# Altium PCB Sound_Sensor.PcbDoc (part 5 of 6)
Units mm, origin at the board's own origin, x right, y up, seen from the top; angles counter-clockwise.
Board outline 90.25 x 88.01 mm, 2 copper layers (Top Layer, Bottom Layer), stack 1.448 mm thick; 369 components, 272 nets, 1045 pads, 508 vias.
Unrouted connection lines stored in the file: 15.
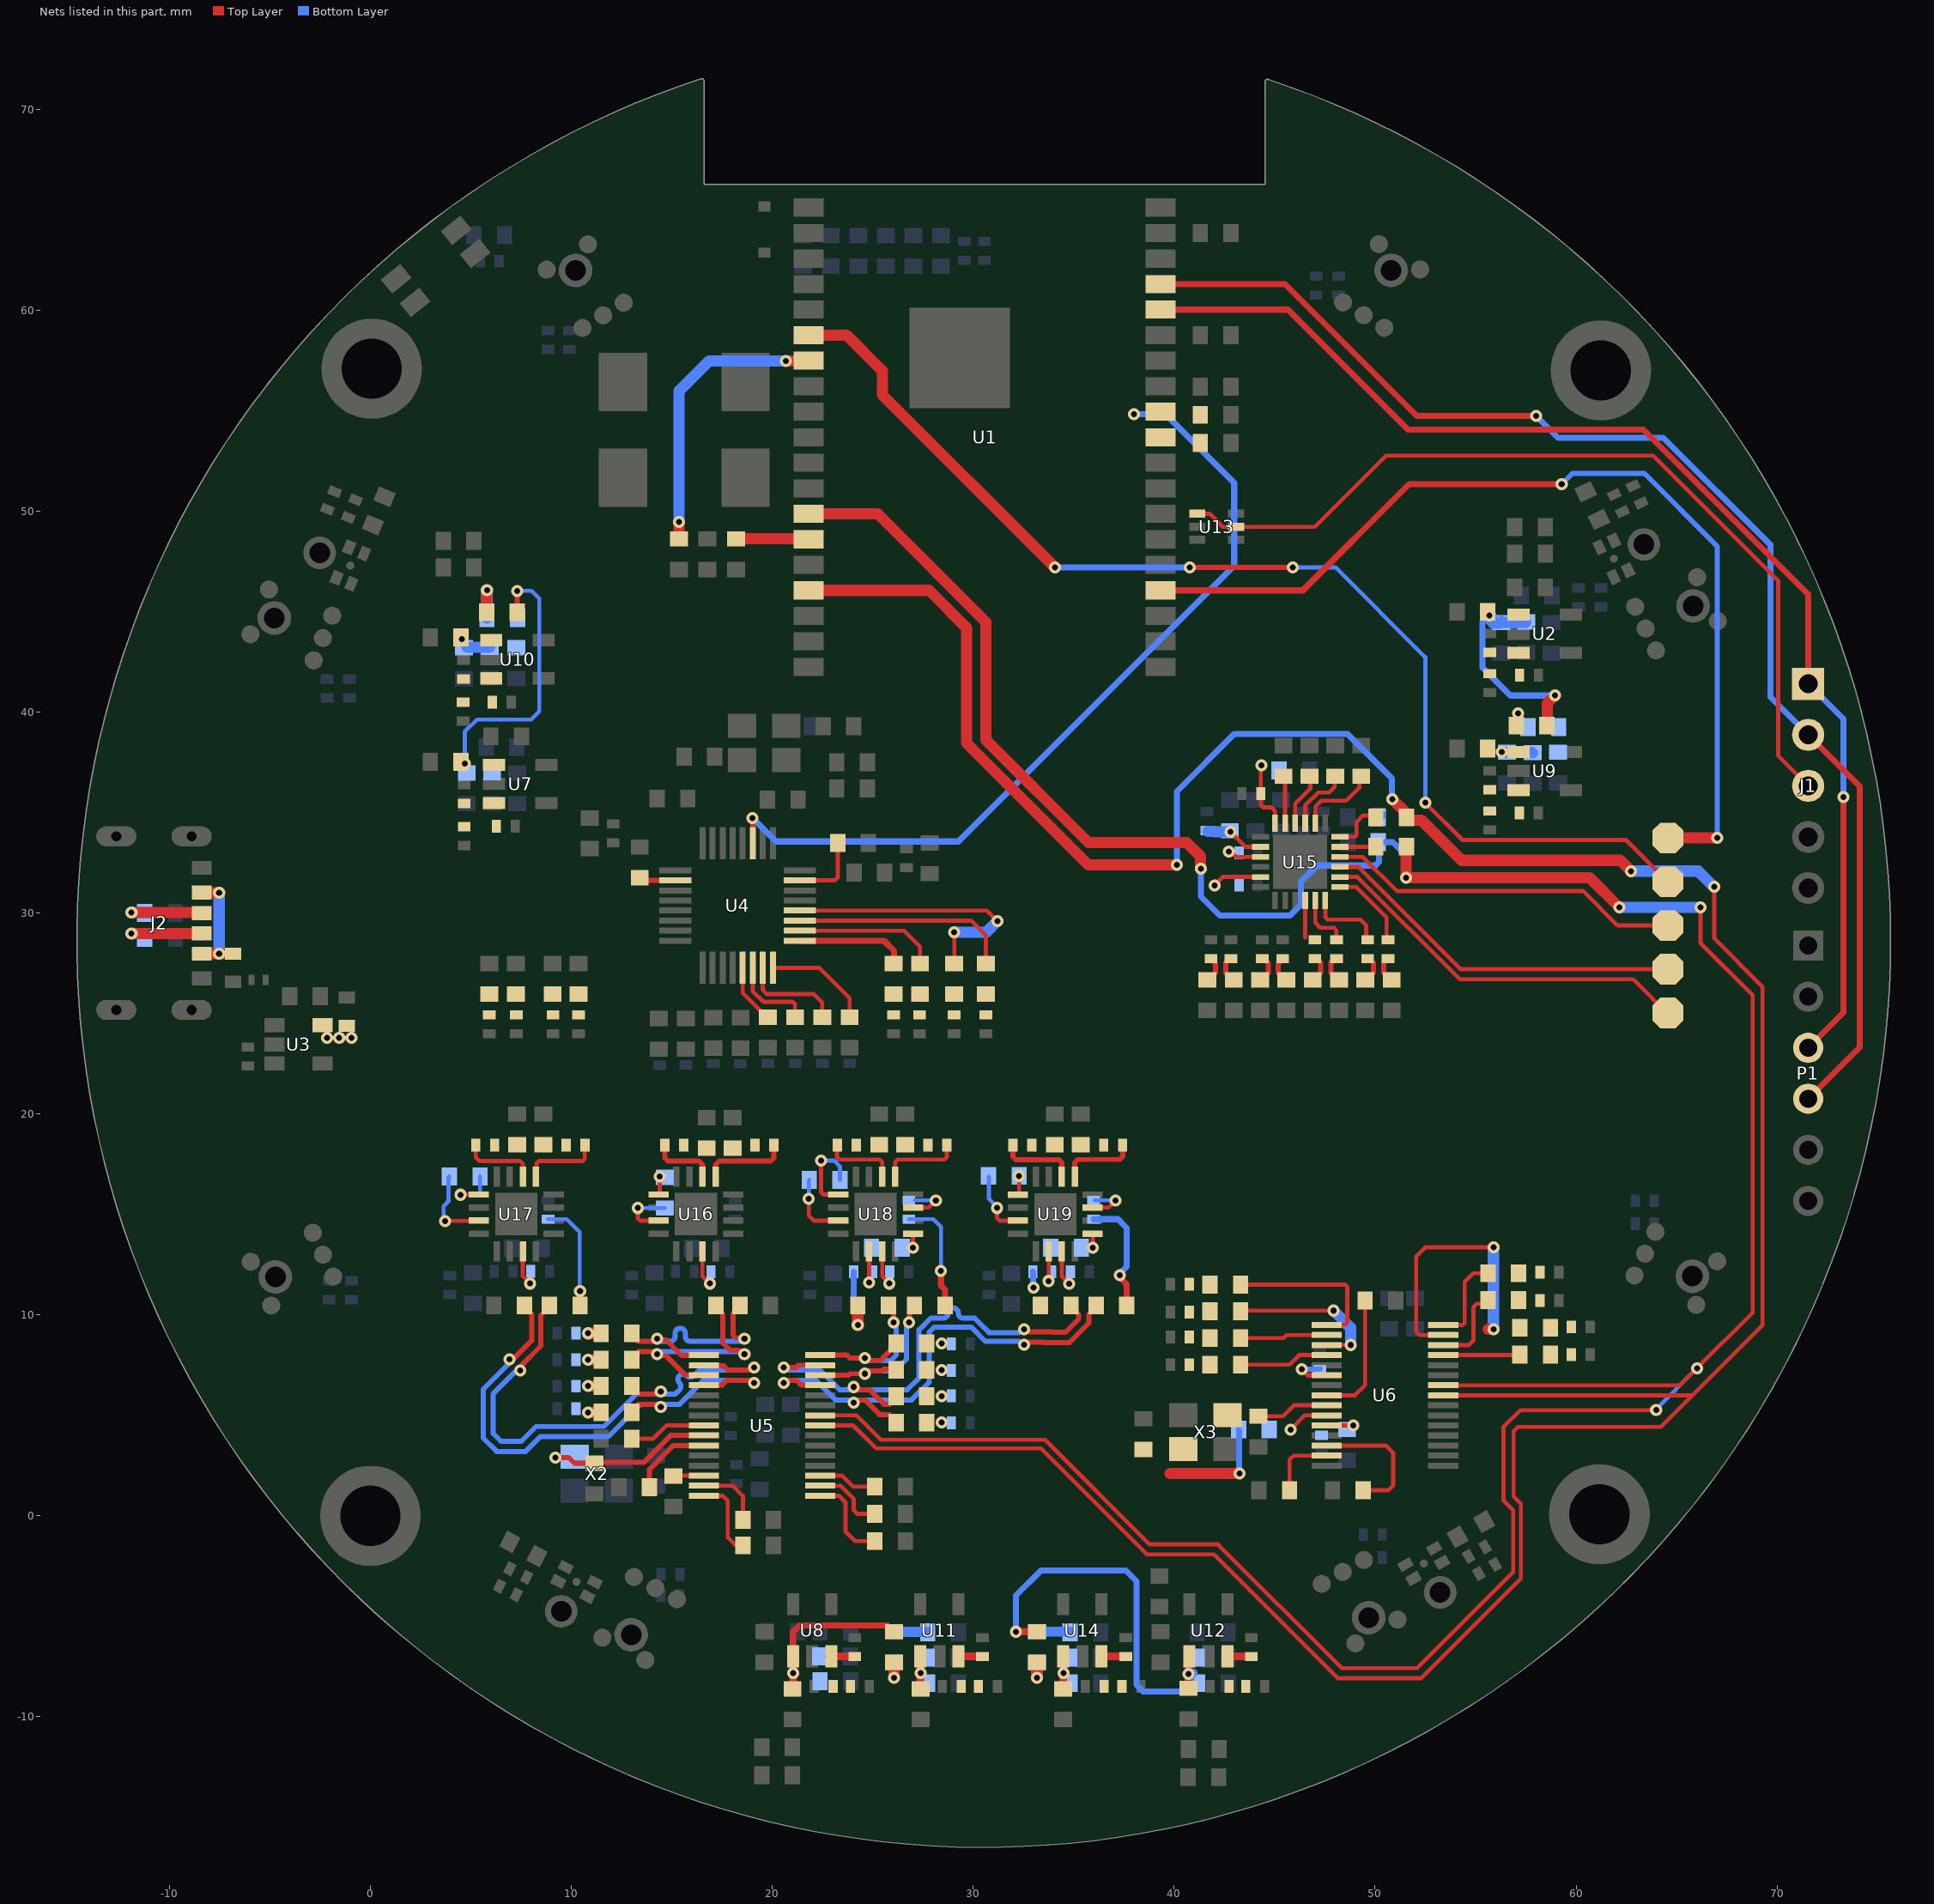
[diagram p4: the nets of this part, all layers, seen from the top]

## Via types
v1: diameter 0.6, hole 0.3, Top Layer to Bottom Layer, 508 vias

## Nets (pads, with @x,y where several pads share a name; then routed paths per layer and width w, separated by ;. In a path a pad name is that pad's centre, name@x,y a point inside that pad or via, vN(x,y) a via of type N, cw(c..) or ccw(c..) an arc to the next point about the centre after c; other vN are vias at no path point) (continued)
NetC67_2: C67.2 SB94.1 | length 5.5
  Top Layer w0.203: v1(10.438,11.187) 10.438,10.466 SB94.1@10.439,10.465
  Bottom Layer w0.203: C67.2@8.839,14.757 9.779,14.757 10.414,14.122 10.414,11.211 v1(10.438,11.187)
NetC68_1: C68.1 U18.5 | length 0.7
  Top Layer w0.203: v1(27.004,13.339) U18.5@27.004,14.038
NetC68_2: C68.2 C92.1 U18.2 | length 1.5
  Top Layer w0.203: v1(24.819,11.611) U18.2@24.819,13.153
NetC69_1: C69.1 U19.5 | length 0.7
  Top Layer w0.203: v1(35.945,13.338) U19.5@35.945,14.036
NetC69_2: C69.2 C93.1 U19.2 | length 1.4
  Top Layer w0.203: v1@33.757,11.709 33.76,11.713 U19.2@33.76,13.151
  other v1: 33.757,11.684
NetC70_2: C70.2 C71.2 U6.11 | length 1.3
  Top Layer w0.203: U6.11@47.587,4.496 v1(48.92,4.496)
NetC72_1: C72.1 U6.6 | length 2.3
  Top Layer w0.254: v1@46.33,7.315 46.332,7.315 46.651,6.996 U6.6@47.587,6.996
  Bottom Layer w0.254: v1(46.355,7.29) C72.1@47.244,7.29 C72.1@47.269,7.315
NetC73_2: C73.2 R9.1 X3.1 | length 5.7
  Top Layer w0.559: 39.802,2.108 v1(43.256,2.108)
  Bottom Layer w0.305: R9.1@43.205,4.293 43.231,4.267 43.231,2.134 v1(43.256,2.108)
NetC90_2: C90.2 R15.1 R19.1 U2.3
NetC91_2: C91.2 R16.1 R20.1 U7.3
NetC92_2: C92.2 SB95.1 | length 3.7
  Top Layer w0.559: v1(24.257,9.5) SB95.1@24.257,10.465
  Bottom Layer w0.305: C92.2@24.054,12.141 24.054,10.541 24.257,10.338 v1(24.257,9.5)
NetC93_2: C93.2 SB96.1 | length 0.9
  Top Layer w0.559: SB96.1@33.249,10.566 SB96.1@33.35,10.465
  Bottom Layer w0.305: C93.2@32.969,12.141 32.982,12.128 32.982,11.367 v1(32.995,11.354)
NetC94_1: C94.1 U18.7 | length 2.3
  Top Layer w0.203: U18.7@27.004,15.338 27.784,15.338 v1(28.143,15.697)
  Bottom Layer w0.203: C94.1@27.102,15.697 v1(28.143,15.697)
NetC94_2: C94.2 SB97.1 | length 5.8
  Top Layer w0.305: v1(28.397,12.188) 28.397,11.455 28.6,11.252 SB97.1@28.6,10.465
  Bottom Layer w0.203: C94.2@26.797,14.757 28.016,14.757 28.397,14.376 v1(28.397,12.188)
NetC95_1: C95.1 U19.7 | length 2.3
  Top Layer w0.203: U19.7@35.945,15.336 36.725,15.336 v1(37.084,15.696)
  Bottom Layer w0.203: C95.1@36.043,15.696 v1(37.084,15.696)
NetC95_2: C95.2 SB98.1 | length 6
  Top Layer w0.305: v1(37.287,11.963) 37.287,11.884 37.643,11.528 SB98.1@37.643,10.465
  Bottom Layer w0.305: C95.2@35.992,14.757 37.211,14.757 37.643,14.326 37.643,12.399 37.287,12.043 v1(37.287,11.963)
NetC98_2: C98.2 U16.3 | length 1.7
  Top Layer w0.203: U16.3@16.529,13.153 16.529,11.919 v1(16.891,11.557)
NetC99_2: C99.2 U17.3 | length 1.7
  Top Layer w0.203: U17.3@7.588,13.153 7.588,11.919 v1(7.95,11.557)
NetC100_2: C100.2 SB18.1
NetC101_2: C101.2 SB19.1
NetC102_2: C102.2 SB20.1
NetC103_2: C103.2 SB21.1
NetC104_2: C104.2 SB22.1
NetC105_2: C105.2 SB23.1
NetC106_2: C106.2 SB24.1
NetC107_2: C107.2 SB25.1
NetC108_2: C108.2 R18.1 R21.1 U8.3 | length 1.2
  Top Layer w0.381: U8.3@22.818,-6.998 C108.2@24.003,-6.998
NetC112_2: C112.2 R28.1 R31.1 U9.3
NetC113_2: C113.2 R29.1 R32.1 U10.3
NetC114_2: C114.2 R30.1 R33.1 U11.3 | length 1.3
  Top Layer w0.381: U11.3@29.337,-7.065 29.27,-6.998 C114.2@30.455,-6.998
NetC116_2: C116.2 R36.1 R37.1 U12.3 | length 1.2
  Top Layer w0.381: U12.3@42.655,-6.998 C116.2@43.84,-6.998
NetC118_2: C118.2 R40.1 R41.1 U14.3 | length 1.2
  Top Layer w0.381: U14.3@36.382,-6.998 C118.2@37.592,-6.998
NetC120_1: C120.1 U15.3 | length 1.6
  Top Layer w0.203: v1@42.774,33.096 42.784,33.096 43.091,32.789 U15.3@44.296,32.789
  other v1: 42.723,33.058
NetC123_1: C123.1 C125.1 U15.2 | length 2.9
  Top Layer w0.203: v1(42.799,34.036) 43.546,33.289 U15.2@44.296,33.289
  Bottom Layer w0.559: C123.1@41.669,34.049 42.013,34.049 42.026,34.036 v1(42.799,34.036)
NetC126_1: C126.1 C127.1 U15.24 | length 3.4
  Top Layer w0.203: v1(44.336,37.338) 44.31,37.313 C126.1@44.31,35.941 44.31,35.374 44.429,35.255 44.831,35.255 45.021,35.065 U15.24@45.021,34.464
NetC128_2: C128.2 U15.5 | length 2.5
  Top Layer w0.203: v1(42.012,31.369) 42.437,31.795 44.29,31.795 U15.5@44.296,31.789
NetC135_2: C135.2 U18.3 | length 1.7
  Top Layer w0.203: U18.3@25.469,13.153 25.469,11.919 v1(25.832,11.557)
NetC136_2: C136.2 U19.3 | length 1.7
  Top Layer w0.203: U19.3@34.41,13.151 34.41,11.918 v1(34.773,11.555)
NetC137_1: C137.1 SB43.2
  other v1: 57.125,39.929
NetC137_2: C137.2 R25.2
NetC138_1: C138.1 SB50.2 | length 2.5
  Top Layer w0.559: SB50.2@5.791,44.958 5.797,44.964 5.797,46.056 v1(5.804,46.063)
  Bottom Layer w0.559: C138.1@5.804,44.677 v1(5.804,46.063)
NetC138_2: C138.2 R26.2
NetC139_1: C139.1 SB51.2 | length 1.5
  Top Layer w0.559: v1(26.06,-8.052) SB51.2@26.06,-7.29
  Bottom Layer w0.559: v1(26.06,-8.052) C139.1@26.06,-7.29
NetC139_2: C139.2 R27.2 | length 1.7
  Bottom Layer w0.508: C139.2@26.06,-5.766 26.073,-5.779 27.724,-5.779 R27.2@27.737,-5.791
NetC140_1: C140.1 SB53.2 | length 1.5
  Top Layer w0.559: v1(33.172,-8.052) SB53.2@33.172,-7.29
  Bottom Layer w0.559: v1(33.172,-8.052) C140.1@33.172,-7.29
NetC140_2: C140.2 R39.2 | length 1.6
  Bottom Layer w0.508: C140.2@33.172,-5.766 R39.2@34.798,-5.766
NetC141_2: C141.2 SB29.1 | length 0.6
  Top Layer w0.559: v1(10.832,9.079) SB29.1@11.481,9.079
NetC142_2: C142.2 SB30.1 | length 0.6
  Top Layer w0.559: v1(10.832,6.457) SB30.1@11.481,6.457
NetC143_2: C143.2 SB32.1 | length 0.6
  Top Layer w0.559: v1(10.832,7.768) SB32.1@11.481,7.768
NetC144_2: C144.2 SB34.1 | length 0.6
  Top Layer w0.559: v1(10.832,5.146) SB34.1@11.481,5.146
NetC145_2: C145.2 SB35.1
  other v1: 28.436,4.638
NetC146_2: C146.2 SB36.1
  other v1: 28.436,7.26
NetC147_2: C147.2 SB37.1
  other v1: 28.436,5.949
NetC148_2: C148.2 SB38.1
  other v1: 28.436,8.571
NetC149_2: C149.2 SB40.1
NetC150_2: C150.2 SB41.1
NetC151_2: C151.2 SB42.1
NetC152_2: C152.2 SB44.1
NetC153_2: C153.2 SB45.1
NetC154_2: C154.2 SB46.1
NetC155_2: C155.2 SB47.1
NetC156_2: C156.2 SB48.1
NetC157_1: C157.1 SB99.2
NetC157_2: C157.2 U16.9 | length 4.3
  Top Layer w0.254: U16.9@17.179,16.873 17.179,17.471 17.36,17.653 19.93,17.653 20.079,17.802 C157.2@20.079,18.44
NetC158_1: C158.1 SB100.2
NetC158_2: C158.2 U17.9 | length 3.9
  Top Layer w0.203: U17.9@8.238,16.873 8.266,16.902 8.266,17.534 8.386,17.653 10.555,17.653 10.674,17.772 10.674,18.434 C158.2@10.681,18.44
NetC159_1: C159.1 SB101.2
NetC159_2: C159.2 U16.10 | length 3.3
  Top Layer w0.254: C159.2@14.656,18.44 14.656,17.802 14.805,17.653 16.347,17.653 16.529,17.471 U16.10@16.529,16.873 U16.10@16.496,16.906
NetC160_1: C160.1 SB102.2
NetC160_2: C160.2 U17.10 | length 3.8
  Top Layer w0.203: C160.2@5.245,18.44 5.245,17.844 5.436,17.653 7.44,17.653 7.588,17.505 U17.10@7.588,16.873 U17.10@7.559,16.902
NetC161_1: C161.1 SB103.2
NetC161_2: C161.2 U18.9 | length 4
  Top Layer w0.203: U18.9@26.119,16.873 26.119,17.609 26.24,17.729 28.57,17.729 28.689,17.848 C161.2@28.689,18.44
NetC162_1: C162.1 SB104.2
NetC162_2: C162.2 U19.9 | length 3.8
  Top Layer w0.254: U19.9@35.06,16.871 35.052,16.88 35.052,17.58 35.201,17.729 37.291,17.729 37.44,17.878 C162.2@37.44,18.44
NetC163_1: C163.1 SB105.2
NetC163_2: C163.2 U18.10 | length 3.6
  Top Layer w0.203: C163.2@23.241,18.39 23.216,18.364 23.216,17.848 23.335,17.729 25.349,17.729 25.469,17.609 U18.10@25.469,16.873
NetC164_1: C164.1 SB106.2
NetC164_2: C164.2 U19.10 | length 3.8
  Top Layer w0.254: C164.2@31.979,18.44 31.979,17.874 32.127,17.725 34.266,17.725 34.414,17.576 U19.10@34.414,16.875
NetC165_2: C165.2 U15.10 | length 1.8
  Top Layer w0.203: 46.521,28.766 U15.10@46.521,30.614
NetC166_2: C166.2 U15.11 | length 2.8
  Top Layer w0.203: U15.11@47.021,30.614 47.021,29.509 47.269,29.261 47.956,29.261 48.075,29.142 C166.2@48.075,28.664
NetC167_2: C167.2 U15.12 | length 3.9
  Top Layer w0.203: U15.12@47.521,30.614 47.521,29.786 47.64,29.667 49.276,29.667 49.552,29.391 C167.2@49.552,28.664 ; C167.2@49.681,28.643 C167.2@49.768,28.556
NetC168_2: C168.2 U15.13 | length 4.1
  Top Layer w0.203: U15.13@48.246,31.289 49.051,31.289 50.571,29.769 C168.2@50.571,28.664
NetFB1_1: FB1.1 J2.A9 J2.B9 | length 5.5
  Top Layer w0.559: J2.A9@-8.391,27.971 v1(-7.524,27.971) FB1.1@-6.833,27.971 ; J2.B9@-8.391,31.011 -8.38,31.001 v1@-7.524,31.001
  Bottom Layer w0.559: v1(-7.524,27.971) v1(-7.524,31.007) v1@-7.524,31.033
NetFB2_1: FB2.1 U3.5
  other v1: -2.15,23.777 -1.545,23.777 -0.94,23.777
NetJ2_A5: J2.A5 R11.1 | length 3.5
  Top Layer w0.559: v1@-11.871,28.981 J2.A5@-8.461,28.981 ; J2.A5@-8.461,28.921 J2.A5@-8.391,28.991
  other v1: -11.882,28.981
NetJ2_B5: J2.B5 R12.1 | length 3.3
  Top Layer w0.559: v1(-11.882,30.017) J2.B5@-8.601,30.017
NetP2_1: P2.1 U15.14 | length 19.4
  Top Layer w0.203: U15.14@48.246,31.789 49.127,31.789 54.221,26.695 62.84,26.695 P2.1@64.77,24.765
NetP3_1: P3.1 U15.16 | length 17.7
  Top Layer w0.203: U15.16@48.246,32.789 49.38,32.789 51.079,31.09 60.35,31.09 62.065,29.375 P3.1@64.567,29.375
NetP4_1: P4.1 U15.15 | length 18.4
  Top Layer w0.203: U15.15@48.246,32.289 48.252,32.283 49.172,32.283 54.258,27.197 P4.1@64.567,27.197
NetP5_1: P5.1 U1.6 | length 58.9
  Top Layer w0.203: v1(52.502,35.484) 54.356,33.63 62.491,33.63 P5.1@64.567,31.554
  Top Layer w0.254: v1(40.781,47.193) v1(45.898,47.193)
  Top Layer w0.559: U1.6@21.819,58.75 23.698,58.75 25.476,56.972 25.476,55.778 v1@34.054,47.201
  Bottom Layer w0.203: v1(45.898,47.193) 48.031,47.193 52.502,42.723 v1(52.502,35.484)
  Bottom Layer w0.305: v1(34.061,47.193) v1(40.781,47.193)
NetP6_1: P6.1 U1.23 | length 48.6
  Top Layer w0.305: U1.23@39.319,46.05 46.406,46.05 51.689,51.333 v1(59.284,51.333)
  Top Layer w0.559: P6.1@64.567,33.732 v1@67.03,33.732
  Bottom Layer w0.254: v1(59.284,51.333) 59.817,51.867 63.398,51.867 67.031,48.235 v1(67.031,33.731)
NetR44_1: R44.1 U16.13 | length 0.9
  Top Layer w0.203: U16.13@14.344,15.988 14.402,16.046 v1(14.402,16.891)
NetR44_2: R44.2 U16.15 | length 2.9
  Top Layer w0.203: v1(13.31,15.316) 13.31,14.807 13.429,14.688 U16.15@14.344,14.688
  Bottom Layer w0.203: v1(13.31,15.316) R44.2@14.656,15.316
NetR45_1: R45.1 U17.13 | length 2.7
  Top Layer w0.203: v1(4.496,15.977) 4.501,15.982 5.397,15.982 U17.13@5.403,15.988
  Bottom Layer w0.203: v1(4.496,15.977) 5.342,15.977 5.461,16.096 R45.1@5.461,16.891
NetR45_2: R45.2 U17.15 | length 4.1
  Top Layer w0.203: v1@3.648,14.672 5.387,14.672 U17.15@5.403,14.688
  Bottom Layer w0.203: v1@3.649,14.672 3.649,14.855 3.648,15.408 3.886,15.646 3.886,16.84 R45.2@3.937,16.891
  other v1: 3.724,14.672
NetR46_1: R46.1 U18.13 | length 4.2
  Top Layer w0.203: v1@22.428,17.704 22.428,16.107 22.547,15.988 U18.13@23.284,15.988
  Bottom Layer w0.203: v1(22.428,17.678) 23.071,17.678 23.368,17.382 R46.1@23.368,16.713
NetR46_2: R46.2 U18.15 | length 3.4
  Top Layer w0.203: v1(21.819,15.773) 21.819,14.935 22.066,14.688 U18.15@23.284,14.688
  Bottom Layer w0.203: v1(21.819,15.773) 21.819,16.688 R46.2@21.844,16.713
NetR47_1: R47.1 U19.13 | length 1
  Top Layer w0.203: U19.13@32.225,15.986 32.283,16.044 v1(32.283,16.916)
  Bottom Layer w0.203: R47.1@32.283,16.889 v1(32.283,16.916)
NetR47_2: R47.2 U19.15 | length 3.3
  Top Layer w0.203: v1(31.191,15.316) 31.191,14.805 31.31,14.686 U19.15@32.225,14.686
  Bottom Layer w0.203: R47.2@30.785,16.864 30.785,15.765 31.191,15.359 v1(31.191,15.316)
NetSB6_1: SB6.1 U1.29
NetSB7_2: SB7.2 U1.14 | length 3.7
  Top Layer w0.559: SB7.2@18.199,48.641 18.224,48.616 21.793,48.616 U1.14@21.819,48.59 ; SB7.2@18.199,48.692 SB7.2@18.25,48.641
NetSB8_2: SB8.2 U4.15 | length 3.7
  Top Layer w0.203: U4.15@21.38,31.617 23.108,31.617 23.259,31.768 SB8.2@23.259,33.479
NetSB9_2: SB9.2 U4.26 | length 1.8
  Top Layer w0.254: SB9.2@13.403,31.65 13.436,31.617 U4.26@15.18,31.617
NetSB14_2: SB14.2 U4.5 | length 3.1
  Top Layer w0.203: U4.5@18.53,27.267 18.53,26.021 19.787,24.765 SB14.2@19.787,24.816
NetSB15_2: SB15.2 U4.6 | length 4.2
  Top Layer w0.203: U4.6@19.03,27.267 19.03,26.106 19.558,25.578 21.014,25.578 21.133,25.459 SB15.2@21.133,24.816
NetSB16_2: SB16.2 U4.7 | length 5
  Top Layer w0.203: U4.7@19.53,27.267 19.53,26.164 19.736,25.959 22.073,25.959 22.479,25.552 SB16.2@22.479,24.816
NetSB17_2: SB17.2 U4.8 | length 5.4
  Top Layer w0.203: U4.8@20.03,27.267 22.339,27.267 23.851,25.756 SB17.2@23.851,24.816
NetSB18_2: SB18.2 U4.9 | length 5.5
  Top Layer w0.305: U4.9@21.38,28.617 25.561,28.617 26.06,28.118 26.06,27.508 SB18.2@26.035,27.483
NetSB19_2: SB19.2 U4.10 | length 7.1
  Top Layer w0.203: U4.10@21.38,29.117 26.56,29.117 27.356,28.321 SB19.2@27.356,27.483
NetSB20_2: SB20.2 U4.11 | length 11
  Top Layer w0.203: U4.11@21.38,29.617 29.895,29.617 30.632,28.88 SB20.2@30.632,27.483
NetSB21_2: SB21.2 U4.12 | length 14
  Top Layer w0.203: U4.12@21.38,30.117 30.685,30.117 31.211,29.591 v1(31.217,29.591) ; SB21.2@29.058,27.483 29.032,27.508 29.058,27.534 v1(29.058,29.032)
  Bottom Layer w0.559: v1@29.063,29.046 29.077,29.032 30.647,29.032 31.205,29.591 v1(31.217,29.591)
NetSB26_2: SB26.2 U5.8 | length 3.9
  Top Layer w0.203: SB26.2@13.005,3.835 14.072,3.835 14.732,4.496 15.469,4.496 15.467,4.497 U5.8@16.595,4.497
NetSB27_2: SB27.2 U5.13 | length 1.5
  Top Layer w0.203: SB27.2@15.088,1.981 15.104,1.997 U5.13@16.595,1.997
NetSB28_2: SB28.2 U5.14 | length 3.4
  Top Layer w0.203: U5.14@16.595,1.497 18.035,1.497 18.542,0.991 SB28.2@18.542,-0.203
NetSB40_2: SB40.2 U6.1 | length 8.2
  Top Layer w0.203: SB40.2@43.307,11.506 48.497,11.506 48.616,11.387 48.616,9.63 48.497,9.511 47.603,9.511 U6.1@47.587,9.496
NetSB41_2: SB41.2 U6.2 | length 4.3
  Top Layer w0.203: SB41.2@43.307,8.848 45.449,8.848 45.597,8.996 U6.2@47.587,8.996
NetSB42_2: SB42.2 U6.3 | length 7.9
  Top Layer w0.203: SB42.2@43.307,10.211 v1(47.93,10.211) ; U6.3@47.587,8.496 47.593,8.502 v1(48.786,8.502)
  Bottom Layer w0.559: v1(47.93,10.211) 48.779,9.362 48.779,8.51 v1(48.786,8.502)
NetSB44_2: SB44.2 U6.4 | length 4.5
  Top Layer w0.203: SB44.2@43.307,7.518 45.745,7.518 46.223,7.996 U6.4@47.587,7.996
NetSB45_2: SB45.2 U6.27 | length 3.8
  Top Layer w0.203: U6.27@53.387,7.996 SB45.2@57.207,7.996
NetSB46_2: SB46.2 U6.28 | length 4.1
  Top Layer w0.203: U6.28@53.387,8.496 54.673,8.496 54.889,8.712 54.889,10.388 55.051,10.55 55.432,10.55 SB46.2@55.618,10.736
NetSB47_2: SB47.2 U6.29 | length 13.5
  Top Layer w0.203: U6.29@53.387,8.996 52.218,8.996 52.04,9.174 52.04,12.899 52.502,13.36 v1(55.888,13.36)
  Top Layer w0.559: v1@55.618,9.279 v1(55.888,9.279)
  Bottom Layer w0.559: v1(55.888,9.279) v1(55.888,13.36)
NetSB48_2: SB48.2 U6.30 | length 4.5
  Top Layer w0.203: U6.30@53.387,9.496 54.352,9.496 54.458,9.601 54.458,11.633 54.889,12.065 SB48.2@55.618,12.065
NetSB49_2: SB49.2 U1.7 | length 14.4
  Top Layer w0.559: SB49.2@15.367,48.616 v1(15.367,49.454) ; v1(20.683,57.463) 21.801,57.463 U1.7@21.819,57.48
  Bottom Layer w0.559: v1(15.367,49.454) 15.367,55.982 16.848,57.463 v1(20.683,57.463)
NetSB70_2: SB70.2 U6.8 | length 6.3
  Top Layer w0.203: U6.8@47.587,5.996 48.998,5.996 49.505,6.502 SB70.2@49.505,10.719
NetSB71_2: SB71.2 U6.13 | length 6.7
  Top Layer w0.203: U6.13@47.587,3.496 50.53,3.496 50.902,3.124 50.902,1.524 50.648,1.27 SB71.2@49.403,1.27
NetSB72_2: SB72.2 U6.14 | length 3.4
  Top Layer w0.203: SB72.2@45.745,1.27 45.745,2.794 45.947,2.996 U6.14@47.587,2.996
NetSB73_1: SB73.1 U5.18 | length 2.9
  Top Layer w0.203: U5.18@22.395,1.997 23.479,1.997 24.02,1.456 SB73.1@25.103,1.456
NetSB74_2: SB74.2 U5.15 | length 3.8
  Top Layer w0.203: U5.15@16.595,0.997 17.533,0.997 17.78,0.75 17.78,-1.067 18.212,-1.499 SB74.2@18.301,-1.499
NetSB75_2: SB75.2 U5.16 | length 4.5
  Top Layer w0.203: U5.16@22.395,0.997 23.31,0.997 23.647,0.66 23.647,-0.787 24.122,-1.262 SB75.2@25.103,-1.262
NetSB76_2: SB76.2 U5.17 | length 4
  Top Layer w0.203: U5.17@22.395,1.497 23.395,1.497 24.054,0.838 24.054,0.279 24.236,0.097 SB76.2@25.103,0.097 SB76.2@24.845,0.355
NetSB77_2: SB77.2 U15.23 | length 2.3
  Top Layer w0.203: U15.23@45.521,34.464 SB77.2@45.521,36.805
NetSB78_1: SB78.1 U15.22 | length 2.7
  Top Layer w0.203: U15.22@46.021,34.464 46.021,35.429 46.774,36.182 SB78.1@46.774,36.805
NetSB79_1: SB79.1 U15.21 | length 3.3
  Top Layer w0.203: U15.21@46.521,34.464 46.521,35.345 47.168,35.992 47.714,35.992 47.989,36.267 47.989,36.775 SB79.1@48.019,36.805
NetSB80_2: SB80.2 U15.20 | length 4
  Top Layer w0.203: U15.20@47.021,34.464 47.021,35.286 47.32,35.585 48.565,35.585 49.217,36.238 49.217,36.714 SB80.2@49.308,36.805
NetSB81_2: SB81.2 U15.18 | length 2.7
  Top Layer w0.203: U15.18@48.246,33.789 48.998,33.789 49.073,33.863 49.073,34.519 49.403,34.849 49.936,34.849 SB81.2@50.038,34.747
NetSB82_2: SB82.2 U15.17 | length 1.8
  Top Layer w0.203: U15.17@48.246,33.289 50.028,33.289 SB82.2@50.038,33.299
OT1_1: C87.2 R4.1 SB43.1 SB62.1 U2.1 | length 10.8
  Top Layer w0.559: SB43.1@58.547,39.319 58.547,39.467 58.565,39.484 58.565,40.429 v1(58.953,40.818)
  Bottom Layer w0.305: v1(55.677,44.806) 55.347,44.475 55.347,42.202 56.731,40.818 v1(58.953,40.818) ; R4.1@55.926,44.755 R4.1@55.926,44.801
  Bottom Layer w0.559: v1(55.677,44.806) 55.677,44.628 55.88,44.425 56.185,44.425 R4.1@56.286,44.526 ; R4.1@56.286,44.45 56.299,44.463 57.493,44.463 C87.2@57.506,44.45
OT1_2: C109.2 R22.1 SB63.1 U9.1 | length 1.4
  Bottom Layer w0.559: R22.1@56.401,37.999 56.414,37.986 57.823,37.986 C109.2@57.836,37.973
  other v1: 56.304,38
OT2_1: C88.2 R5.1 SB50.1 SB64.1 U7.1 | length 13.7
  Top Layer w0.254: SB50.1@7.315,44.958 v1(7.315,46.025)
  Bottom Layer w0.203: v1(4.699,37.426) 4.699,39.014 5.309,39.624 8.009,39.624 8.407,40.022 8.407,45.644 8.026,46.025 v1(7.315,46.025)
OT2_2: C110.2 R23.1 SB65.1 U10.1 | length 1.3
  Top Layer w0.559: SB65.1@4.508,43.712 4.508,43.673 v1(4.559,43.622) SB65.1@4.61,43.571
  Bottom Layer w0.559: v1(4.559,43.622) v1@4.562,43.622 ; R23.1@4.808,43.235 4.826,43.217 C110.2@5.944,43.217
OT3_1: C89.2 R6.1 SB51.1 SB66.1 U8.1 | length 8
  Top Layer w0.203: SB51.1@25.743,-5.448 SB51.1@26.06,-5.766
  Top Layer w0.305: U8.1@21.034,-6.997 21.034,-5.789 21.374,-5.448 SB51.1@25.743,-5.448
  Top Layer w0.381: SB66.1@21.034,-8.521 U8.1@21.034,-6.997
  other v1: 21.044,-7.831
OT3_2: C111.2 R24.1 SB67.1 U11.1 | length 1.6
  Top Layer w0.381: SB67.1@27.305,-8.585 27.369,-8.521 U11.1@27.369,-6.997
  other v1: 27.38,-7.831
OT4_1: C115.2 R34.1 SB53.1 SB68.1 U12.1 | length 20
  Top Layer w0.381: v1(32.131,-5.766) SB53.1@33.172,-5.766 ; SB68.1@40.697,-8.566 40.716,-8.546 v1(40.716,-7.874) 40.736,-7.854 40.736,-7.017 U12.1@40.755,-6.997
  Bottom Layer w0.305: v1(32.131,-5.766) 32.131,-3.962 33.378,-2.715 37.59,-2.715 38.125,-3.251 38.125,-8.41 38.453,-8.738 40.526,-8.738
  Bottom Layer w0.381: 40.526,-8.738 40.811,-8.452 40.811,-7.969 v1@40.97,-7.81
OT4_2: C117.2 R38.1 SB69.1 U14.1 | length 1.4
  Top Layer w0.381: SB69.1@34.481,-8.395 34.481,-7.841 v1(34.492,-7.831) 34.487,-7.826 34.487,-7.003 U14.1@34.481,-6.997
PCM1_N: SB29.2 SB93.2 U5.1 | length 11.5
  Top Layer w0.254: SB29.2@13.005,9.079 13.005,9.016 13.343,8.678 v1@14.046,8.678 ; v1(14.275,8.813) 14.341,8.747 14.717,8.747 15.489,7.974 16.572,7.974 U5.1@16.595,7.997 ; SB93.2@18.39,10.465 18.39,10.401 18.045,10.056 18.045,8.992 18.193,8.843 18.588,8.843 v1(18.618,8.813)
  Bottom Layer w0.254: v1(14.275,8.813) 14.368,8.813 14.503,8.678 14.786,8.678 14.913,8.678 ccw(c14.913,8.932) 15.167,8.932 15.167,9.081 cw(c15.421,9.081) 15.675,9.081 15.675,8.932 ccw(c15.929,8.932) 15.929,8.678 17.247,8.678 18.39,8.678 18.525,8.813 v1(18.618,8.813)
PCM1_P: SB32.2 SB91.2 U5.3 | length 11.8
  Top Layer w0.254: SB32.2@13.005,7.768 13.005,7.832 13.343,8.17 v1@14.046,8.17 ; v1(14.275,8.035) 14.341,7.969 14.713,7.969 15.674,7.008 16.585,7.008 U5.3@16.595,6.997 ; SB91.2@17.192,10.465 17.192,10.401 17.537,10.056 17.537,8.601 17.893,8.245 18.315,8.245 18.525,8.035 v1(18.618,8.035)
  Bottom Layer w0.254: v1(14.275,8.035) 14.368,8.035 14.503,8.17 18.39,8.17 18.525,8.035 v1(18.618,8.035)
PCM2_N: SB30.2 SB94.2 U5.2 | length 26.2
  Top Layer w0.254: v1(7.468,7.239) 7.534,7.305 7.534,7.496 8.484,8.446 8.484,9.97 8.915,10.401 SB94.2@8.915,10.465 ; SB30.2@13.005,6.457 13.005,6.394 13.343,6.056 v1@14.224,6.056 ; U5.2@16.595,7.497 16.618,7.474 17.57,7.474 17.793,7.251 v1@18.872,7.251
  Bottom Layer w0.254: v1@7.211,7.173 6.121,6.084 6.121,4.089 6.502,3.708 7.511,3.708 8.248,4.445 11.626,4.445 13.237,6.056 14.224,6.056 14.359,6.191 v1(14.453,6.191) ; v1@14.681,6.056 15.178,6.056 15.291,6.169 15.38,6.259 ccw(c15.201,6.438) 15.38,6.618 cw(c15.56,6.797) 15.38,6.977 cw(c15.56,6.797) 15.74,6.977 ccw(c15.919,7.157) 16.099,6.977 16.373,7.251 17.231,7.251 18.872,7.251 19.007,7.386 v1(19.101,7.386)
PCM2_P: SB34.2 SB92.2 U5.4 | length 26.5
  Top Layer w0.254: v1(6.918,7.789) 6.984,7.855 7.175,7.855 8.028,8.709 8.028,10.044 7.671,10.401 SB92.2@7.671,10.465 ; SB34.2@13.005,5.146 13.005,5.21 13.343,5.548 v1@14.224,5.548 ; U5.4@16.595,6.497 16.61,6.512 17.511,6.512 17.742,6.743 v1@18.872,6.743
  Bottom Layer w0.254: v1@6.851,7.532 5.613,6.294 5.613,3.879 6.292,3.2 7.722,3.2 8.458,3.937 11.836,3.937 13.447,5.548 14.224,5.548 14.359,5.413 v1(14.453,5.413) ; v1@14.681,5.548 15.388,5.548 16.584,6.743 18.872,6.743 19.007,6.608 v1(19.101,6.608)
PCM3_N: SB36.2 SB97.2 U5.28 | length 8.8
  Top Layer w0.254: U5.28@22.395,6.997 23.805,6.997 23.878,7.071 v1(24.613,7.071) ; v1@24.841,7.206 25.462,7.206 25.549,7.293 26.13,7.293 SB36.2@26.162,7.26 ; v1(26.818,9.627) 26.822,9.631 26.822,10.211 SB97.2@27.076,10.465
  Bottom Layer w0.254: v1(24.613,7.071) 24.706,7.071 24.841,7.206 26.101,7.206 26.683,7.787 26.683,9.398 26.818,9.533 v1(26.818,9.627)
PCM3_P: SB38.2 SB95.2 U5.30 | length 8.4
  Top Layer w0.254: U5.30@22.395,7.997 23.726,7.997 23.875,7.849 v1(24.613,7.849) ; v1@24.841,7.714 25.368,7.714 26.162,8.508 SB38.2@26.162,8.571 ; SB95.2@25.781,10.465 26.035,10.211 26.035,9.631 v1(26.04,9.627)
  Bottom Layer w0.254: v1(24.613,7.849) 24.706,7.849 24.841,7.714 25.891,7.714 26.175,7.997 26.175,9.398 26.04,9.533 v1(26.04,9.627)
PCM4_N: SB35.2 SB98.2 U5.27 | length 24.7
  Top Layer w0.254: v1@20.803,6.743 21.202,6.743 21.448,6.497 U5.27@22.395,6.497 ; v1@24.257,5.766 24.616,5.766 25.342,5.04 25.824,5.04 26.162,4.702 SB35.2@26.162,4.638 ; v1(32.537,8.509) 32.631,8.509 32.766,8.644 33.45,8.644 33.475,8.618 34.791,8.618 35.75,9.578 35.75,10.033 36.119,10.401 SB98.2@36.119,10.465
  Bottom Layer w0.254: v1(20.574,6.608) 20.668,6.608 20.803,6.743 22.162,6.743 23.139,5.766 23.825,5.766 23.96,5.631 24.147,5.631 24.282,5.766 26.931,5.766 27.813,6.648 27.813,9.144 28.067,9.398 29.89,9.398 30.608,8.68 32.273,8.68 32.444,8.509 v1(32.537,8.509)
  other v1: 24.054,5.631
PCM4_P: SB37.2 SB96.2 U5.29 | length 24.5
  Top Layer w0.254: v1(20.574,7.386) 21.195,7.386 21.306,7.497 U5.29@22.395,7.497 ; v1@24.257,6.274 24.826,6.274 25.552,5.548 25.824,5.548 26.162,5.886 SB37.2@26.162,5.949 ; v1(32.537,9.287) 32.631,9.287 32.766,9.152 33.932,9.152 33.958,9.126 34.581,9.126 35.242,9.788 35.242,10.033 34.874,10.401 SB96.2@34.874,10.465
  Bottom Layer w0.254: v1(20.574,7.386) 20.668,7.386 20.803,7.251 20.882,7.251 22.073,7.251 22.372,7.251 23.35,6.274 23.825,6.274 23.96,6.409 24.147,6.409 24.282,6.274 26.721,6.274 27.305,6.858 27.305,9.253 27.886,9.834 28.372,9.834 28.499,9.834 ccw(c28.499,10.088) 28.753,10.088 cw(c29.007,10.088) 29.261,10.088 ccw(c29.515,10.088) 29.515,9.834 30.071,9.834 30.226,9.679 30.789,9.116 32.273,9.116 32.444,9.287 v1(32.537,9.287)
  other v1: 24.054,6.409
RTS: J1.3 U13.1 U13.5 | length 44.1
  Top Layer w0.203: U13.1@41.148,49.865 41.768,49.865 42.418,49.215 U13.5@43.088,49.215 46.05,49.215 47.005,49.215 50.546,52.756 63.83,52.756 70.053,46.533 70.053,37.821 J1.3@71.552,36.322
RX: J1.1 P1.3 U1.34 | length 62.1
  Top Layer w0.305: U1.34@39.319,60.02 45.669,60.02 51.638,54.051 63.348,54.051 71.552,45.847 J1.1@71.552,41.402 ; P1.3@71.552,23.292 73.304,25.044 v1(73.304,35.763)
  Bottom Layer w0.305: J1.1@71.552,41.402 73.304,39.649 v1(73.304,35.763)
SCL: R42.1 SB82.1 U1.13 U5.24 U6.24 | length 161.7
  Top Layer w0.203: U5.24@22.395,4.997 24.187,4.997 25.4,3.785 33.579,3.785 38.786,-1.422 42.185,-1.422 48.34,-7.577 52.087,-7.577 56.871,-2.794 56.871,0.279 56.388,0.762 56.388,4.416 57.23,5.258 v1(63.983,5.258) ; U6.24@53.387,6.496 65.17,6.496 v1(66.015,7.341) 68.783,10.109 68.783,25.908 66.192,28.499 v1(66.192,30.277) v1@66.192,30.328
  Top Layer w0.559: U1.13@21.819,49.86 25.248,49.86 30.629,44.479 30.629,38.612 35.738,33.503 40.616,33.503 41.318,32.801 41.318,32.215 v1(41.326,32.207) ; SB82.1@51.544,33.299 v1(51.544,31.758) 60.673,31.758 v1(62.154,30.277)
  Bottom Layer w0.203: v1(63.983,5.258) 63.983,5.309 v1(66.015,7.341)
  Bottom Layer w0.305: v1(41.326,32.207) 41.326,30.81 42.266,29.87 45.765,29.87 46.304,30.409 46.304,31.555 47.109,32.36 50.012,32.36 50.19,32.538 50.19,33.485 R42.1@50.156,33.519 50.885,33.519 51.544,32.86 v1(51.544,31.758)
  Bottom Layer w0.559: v1@62.173,30.277 v1(66.192,30.277)
SCLK: SB4.1 U1.30 U4.19 | length 41.9
  Top Layer w0.254: U4.19@19.03,33.467 v1@19.03,34.706
  Bottom Layer w0.305: v1(19.02,34.717) 20.183,33.553 29.262,33.553 42.99,47.281 42.99,51.397 39.573,54.813 v1(37.998,54.813)
SDA: R43.1 SB81.1 U1.16 U5.23 U6.23 | length 162.3
  Top Layer w0.203: U5.23@22.395,4.497 24.027,4.497 25.171,3.353 33.376,3.353 38.651,-1.922 41.978,-1.922 48.133,-8.077 52.295,-8.077 57.252,-3.12 57.252,0.606 56.888,0.969 56.888,4.208 57.099,4.42 64.211,4.42 65.788,5.996 ; U6.23@53.387,5.996 65.788,5.996 ; v1(66.878,31.293) 66.878,28.727 69.283,26.322 69.283,9.492 65.788,5.996
  Top Layer w0.559: U1.16@21.819,46.05 27.813,46.05 29.667,44.196 29.667,38.456 35.738,32.385 v1(40.132,32.385) ; v1@50.859,35.654 51.46,35.052 51.46,34.849 SB81.1@51.562,34.747 ; SB81.1@51.562,34.707 51.664,34.605 52.313,34.605 54.305,32.614 62.205,32.614 v1(62.738,32.08)
  Bottom Layer w0.305: v1(40.132,32.385) 40.132,36.043 43.002,38.913 48.616,38.913 50.843,36.685 v1@50.843,35.669
  Bottom Layer w0.559: R43.1@50.156,34.764 R43.1@50.258,34.865 ; v1@50.843,35.669 v1(50.851,35.662) ; v1@62.746,32.061 62.746,32.069 62.757,32.08 66.08,32.08 66.867,31.293 v1(66.878,31.293)
TLV_ADC.TLV_IN1_N: C25.1 SB84.2 | length 1.4
  Top Layer w0.254: C25.1@42.828,27.724 42.739,27.724 42.565,27.55 42.565,27.007 42.902,26.67 SB84.2@42.966,26.67
TLV_ADC.TLV_IN1_P: C24.1 SB83.2 | length 1.4
  Top Layer w0.254: SB83.2@41.656,26.67 41.719,26.67 42.057,27.007 42.057,27.474 42.024,27.506 42.024,27.622 41.923,27.724 C24.1@41.834,27.724
TLV_ADC.TLV_IN2_N: C32.1 SB86.2 | length 1.4
  Top Layer w0.254: C32.1@45.401,27.724 45.312,27.724 45.21,27.622 45.21,27.499 45.185,27.474 45.185,27.007 45.522,26.67 SB86.2@45.586,26.67
TLV_ADC.TLV_IN2_P: C30.1 SB85.2 | length 1.4
  Top Layer w0.254: SB85.2@44.276,26.67 44.339,26.67 44.677,27.007 44.677,27.517 44.47,27.724 C30.1@44.381,27.724
TLV_ADC.TLV_IN3_N: C166.1 SB88.2 | length 1.4
  Top Layer w0.254: C166.1@48.075,27.724 47.986,27.724 47.805,27.543 47.805,27.007 48.142,26.67 SB88.2@48.206,26.67
TLV_ADC.TLV_IN3_P: C165.1 SB87.2 | length 1.4
  Top Layer w0.254: SB87.2@46.896,26.67 46.959,26.67 47.297,27.007 47.297,27.521 47.093,27.724 C165.1@47.005,27.724
TLV_ADC.TLV_IN4_N: C168.1 SB90.2 | length 1.4
  Top Layer w0.254: C168.1@50.648,27.724 50.559,27.724 50.457,27.622 50.457,27.506 50.424,27.474 50.424,27.007 50.762,26.67 SB90.2@50.825,26.67
TLV_ADC.TLV_IN4_P: C167.1 SB89.2 | length 1.4
  Top Layer w0.254: SB89.2@49.515,26.67 49.579,26.67 49.916,27.007 49.916,27.525 49.717,27.724 C167.1@49.628,27.724
TX: J1.2 P1.4 U1.35 | length 66.2
  Top Layer w0.305: U1.35@39.319,61.29 45.517,61.29 52.073,54.734 58.01,54.734 v1(58.014,54.737) ; P1.4@71.552,20.752 74.117,23.317 74.117,36.297 J1.2@71.552,38.862
  Bottom Layer w0.305: v1(58.014,54.737) 59.106,53.645 64.338,53.645 69.672,48.311 69.672,40.742 J1.2@71.552,38.862
XI_A: R8.2 U5.10 | length 4.4
  Top Layer w0.254: R8.2@13.894,1.143 13.894,2.311 15.08,3.497 U5.10@16.595,3.497
XI_B: R9.2 U6.10 | length 2.1
  Top Layer w0.203: v1(45.796,4.293) 46.5,4.996 U6.10@47.587,4.996
XO_A#: C62.2 U5.9 X2.3 | length 8.1
  Top Layer w0.254: v1(9.203,2.905) 9.871,2.905 10.16,2.616 C62.2@11.151,2.616 ; C62.2@11.151,2.667 13.614,2.667 14.945,3.997 U5.9@16.595,3.997
XO_B#: C74.2 U6.9 X3.3 | length 3.6
  Top Layer w0.203: C74.2@44.188,4.955 45.417,4.955 45.958,5.496 U6.9@47.587,5.496
pads on no net: U1.4 U1.5 U1.17 U1.18 U1.19 U1.20 U1.21 U1.22 U1.24 U1.27 U1.28 U1.32 U3.4 U4.27 U5.5 U5.22 U5.26 U6.5 U6.22 U6.26 U16.6 U16.8 U16.12 U16.14 U17.6 U17.8 U17.12 U17.14 U18.6 U18.8 U18.12 U18.14 U19.6 U19.8 U19.12 U19.14

## Polygon pours and split planes (outlines as drawn)
GND on Top Layer "GND_L01_P006" (hatched 45Degree grid 0.508 track 0.203, remove dead copper, pour order 6): 9.304,65.659 3.556,61.392 0.499,58.651 -2.007,55.931 -4.242,52.984 -5.055,51.765 -6.712,49.055 -8.35,45.732 -10.008,41.275 -10.82,38.354 -11.558,34.291 -11.878,30.896 -11.937,28.038 -11.811,25.375 -11.201,20.701 -10.414,17.323 -9.347,14.173 -7.264,9.5 -5.385,5.994 -2.134,1.473 2.616,-3.378 6.842,-6.512 10.189,-8.656 13.36,-10.16 16.307,-11.328 20.371,-12.598 24.486,-13.386 27.457,-13.665 30.531,-13.818 33.68,-13.716 37.313,-13.259 40.411,-12.687 44.044,-11.633 47.828,-10.16 51.359,-8.382 54.559,-6.401 58.877,-3.023 62.23,0.356 64.773,3.514 66.015,5.334 67.996,8.687 69.799,12.471 71.501,17.577 72.394,21.571 72.741,24.004 72.974,28.575 72.882,31.633 72.339,35.687 71.806,38.684 70.815,42.139 69.926,44.272 69.132,46.285 67.361,49.632 66.015,51.918 64.338,54.28 61.214,57.988 56.871,61.849 52.213,65.404
GND on Bottom Layer "GND_L02_P007" (hatched 45Degree grid 0.508 track 0.203, remove dead copper, pour order 7): 9.304,65.659 3.556,61.392 0.499,58.651 -2.007,55.931 -4.242,52.984 -5.055,51.765 -6.712,49.055 -8.35,45.732 -10.008,41.275 -10.82,38.354 -11.558,34.291 -11.878,30.896 -11.937,28.038 -11.811,25.375 -11.201,20.701 -10.414,17.323 -9.347,14.173 -7.264,9.5 -5.385,5.994 -2.134,1.473 2.616,-3.378 6.842,-6.512 10.189,-8.656 13.36,-10.16 16.307,-11.328 20.371,-12.598 24.486,-13.386 27.457,-13.665 30.531,-13.818 33.68,-13.716 37.313,-13.259 40.411,-12.687 44.044,-11.633 47.828,-10.16 51.359,-8.382 54.559,-6.401 58.877,-3.023 62.23,0.356 64.773,3.514 66.015,5.334 67.996,8.687 69.799,12.471 71.501,17.577 72.394,21.571 72.741,24.004 72.974,28.575 72.882,31.633 72.339,35.687 71.806,38.684 70.815,42.139 69.926,44.272 69.132,46.285 67.361,49.632 66.015,51.918 64.338,54.28 61.214,57.988 56.871,61.849 52.213,65.404

## Other copper
Top Layer:
  rectangle net GND: 14.351,31.953 16.002,34.849
  rectangle net NetFB2_1: -2.991,23.393 -0.584,25.009
  rectangle net NetFB1_1: -8.915,27.559 -6.325,28.372
  region net 5V: -5.588,24.028 -5.588,26.436 -6.629,26.436 -6.629,24.028
  rectangle net 5V: -7.341,26.187 -5.588,27.229
  rectangle net 5V: -6.604,21.463 -3.251,22.86
  region net 5V: -3.251,22.047 -3.251,24.79 -4.013,24.79 -4.013,22.047
  rectangle net GND: 14.427,36.754 16.256,38.684
  rectangle net NetC64_2: 14.757,9.982 16.129,11.049
  region net GND: 7.923,-1.216 7.434,-0.962 5.992,-3.733 6.48,-3.987
  rectangle net NetC91_2: 4.28,33.822 6.719,35.816
  rectangle net 3V3: -2.991,25.324 -0.584,27.356
  rectangle net NetC61_2: 11.938,0.965 13.183,1.956
  rectangle net NetC1_1: 55.474,45.745 57.556,47.142
  rectangle net NetC100_2: 25.527,24.638 26.492,26.416
  rectangle net NetC101_2: 26.848,24.638 27.813,26.416
  rectangle net NetC103_2: 28.55,24.638 29.515,26.416
  rectangle net NetC102_2: 30.124,24.638 31.09,26.416
  rectangle net NetC104_2: 5.359,24.663 6.477,26.365
  rectangle net NetC105_2: 6.68,24.663 7.798,26.365
  rectangle net NetC106_2: 8.509,24.663 9.627,26.365
  rectangle net NetC107_2: 10.058,24.689 10.668,26.34
  rectangle net NetC162_1: 34.874,18.085 36.754,18.872
  region net NetC164_1: 34.544,18.872 32.664,18.872 32.664,18.085 34.544,18.085
  region net NetC163_1: 25.806,18.872 23.927,18.872 23.927,18.085 25.806,18.085
  rectangle net NetC161_1: 26.137,18.085 28.016,18.872
  region net NetC159_1: 17.196,18.872 15.316,18.872 15.316,17.958 17.196,17.958
  rectangle net NetC157_1: 17.577,17.958 19.38,18.872
  rectangle net NetC45_2: 13.81,22.809 14.877,23.724
  rectangle net NetC46_2: 15.167,22.809 16.234,23.724
  rectangle net NetC47_2: 16.525,22.86 17.591,23.774
  rectangle net NetC48_2: 17.882,22.86 18.948,23.774
  region net NetC160_1: 7.798,18.999 5.893,18.999 5.893,18.059 7.798,18.059
  rectangle net NetC158_1: 8.128,18.059 10.033,18.999
  rectangle net NetC66_2: 19.507,9.271 20.574,10.973
  rectangle net NetC145_2: 27.305,4.068 28.778,5.197
  rectangle net NetC147_2: 27.305,5.379 28.778,6.508
  rectangle net NetC146_2: 27.305,6.69 28.778,7.819
  rectangle net NetC148_2: 27.305,8.001 28.778,9.13
  rectangle net NetC152_2: 40.462,7.036 42.164,7.976
  rectangle net NetC150_2: 40.462,8.365 42.164,9.305
  rectangle net NetC151_2: 40.462,9.694 42.164,10.634
  rectangle net NetC149_2: 40.462,11.024 42.164,11.963
  rectangle net NetC26_1: 19.126,-6.248 20.523,-5.359
  rectangle net NetC28_1: 38.811,-6.274 39.802,-4.089
  rectangle net NetC93_2: 32.842,9.982 33.909,11.201
  rectangle net NetC93_2: 32.563,9.982 33.274,11.684
  rectangle net NetC153_2: 58.332,7.544 60.186,8.56
  rectangle net NetC155_2: 58.332,8.873 60.186,9.889
  rectangle net NetC154_2: 56.744,10.253 58.598,11.269
  rectangle net NetC156_2: 56.744,11.582 58.598,12.598
  rectangle net NetC23_1: 5.283,38.252 6.528,39.497
  rectangle net NetC165_2: 46.419,28.346 47.334,28.956
  rectangle net GND: 18.898,64.643 21.768,65.557
  rectangle net GND: -13.208,23.063 -7.823,27.127
  rectangle net GND: -13.138,31.648 -7.01,34.366
  rectangle net 3V3: 17.501,50.165 19.964,64.287
  rectangle net 3V3: 18.923,63.322 21.234,64.287
  rectangle net GND: -5.359,25.146 -3.505,27.229
  rectangle net GND: 43.129,35.255 43.84,36.297
  rectangle net 3V3: 24.282,32.868 25.222,38.075
  region net GND: 61.577,50.434 61.01,51.624 59.797,51.045 60.364,49.855
  region net GND: 55.039,-1.132 56.338,-0.397 55.326,1.392 54.027,0.657
  region net GND: 55.956,-2.87 56.448,-2.592 54.468,0.907 53.977,0.629
  region net 3V3: 54.807,-3.608 55.722,-3.09 54.186,-0.375 53.271,-0.893
  region net GND: 7.641,-1.062 6.826,-0.638 6.334,-1.583 7.149,-2.007
  rectangle net 3V3: 47.371,34.239 48.717,34.976
  rectangle net 3V3: 50.076,36.601 57.709,37.414
  rectangle net 3V3: 43.79,33.655 44.679,34.442
  rectangle net 3V3: 24.384,32.868 28.626,34.112
  region net GND: 8.068,-5.067 10.043,-6.096 10.882,-4.484 8.907,-3.456
  region net GND: 63.136,51.128 62.881,51.662 61.226,50.873 61.481,50.339
  region net 3V3: 61.628,47.978 61.118,49.049 60.547,48.777 61.058,47.706
  region net 3V3: 63.281,50.999 60.19,49.525 60.6,48.665 63.692,50.139
  region net 3V3: 9.661,-0.305 8.91,0.086 6.604,-4.343 7.355,-4.734
  rectangle net 3V3: 0.813,36.044 6.719,36.806
  rectangle net OT2_1: 4.089,37.009 6.719,38.025
  region net GND: 41.224,5.637 37.94,5.637 37.94,4.42 41.224,4.42
  region net NetC73_2: 41.224,3.937 37.94,3.937 37.94,1.829 41.224,1.829
  rectangle net GND: 41.885,2.591 44.907,3.937
  rectangle net XO_B#: 41.885,4.42 44.907,5.639
  rectangle net NetSB74_2: 17.678,-2.032 18.999,-0.965
  rectangle net \C\S: 19.888,32.639 20.933,34.29
  rectangle net NetSB47_2: 55.22,8.848 57.709,9.855
  rectangle net 3V3: 41.406,-9.881 42.092,-6.419
  rectangle net OT3_1: 25.476,-6.299 26.619,-5.182
  rectangle net NetC116_2: 42.339,-8.883 43.025,-6.419
  rectangle net NetC108_2: 23.025,-8.89 24.384,-8.077
  rectangle net NetC114_2: 29.4,-8.89 30.759,-8.077
  rectangle net NetC116_2: 42.779,-8.883 43.929,-8.07
  rectangle net NetC118_2: 36.512,-8.89 37.871,-8.077
  rectangle net 3V3: 35.114,-9.728 35.8,-6.401
  rectangle net NetC118_2: 36.047,-8.89 36.733,-6.426
  rectangle net 3V3: 28.027,-9.804 28.713,-6.426
  rectangle net NetC114_2: 28.935,-8.89 29.621,-6.426
  rectangle net NetC108_2: 22.6,-8.89 23.285,-6.426
  rectangle net 3V3: 21.666,-9.728 22.352,-6.426
  rectangle net NetC112_2: 55.169,34.595 57.696,36.424
  rectangle net NetC137_1: 56.642,38.862 57.633,40.259
  rectangle net OT1_2: 55.169,37.644 57.696,38.66
  rectangle net 3V3: 55.169,43.434 60.325,44.247
  rectangle net NetC90_2: 55.169,41.427 57.696,43.256
  rectangle net OT1_1: 55.169,44.477 57.696,45.493
  rectangle net \R\E\S\E\T\: 22.751,35.663 23.978,36.73
  rectangle net \C\S: 22.751,36.959 23.978,38.025
  rectangle net NetC113_2: 4.14,40.018 6.579,42.012
  rectangle net 3V3: 3.327,42.24 6.579,43.002
  rectangle net OT2_2: 4.115,43.205 6.579,44.221
  rectangle net GND: 13.919,38.659 19.253,40.005
  rectangle net GND: 10.287,34.011 14.834,40.005
  rectangle net 3V3: 10.338,32.791 13.894,33.755
  rectangle net GND: 25.121,31.217 28.753,32.588
  rectangle net ADC1_XOUT#: 16.688,36.982 19.279,38.456
  rectangle net NetC43_2: 19.964,38.71 22.936,40.589
  region net 3V3: -2.18,50.91 0.824,49.666 1.368,50.979 -1.636,52.223
  region net GND: -2.633,49.898 0.4,48.642 0.742,49.47 -2.29,50.726
  rectangle net GND: -13.716,23.063 -4.267,23.851
  rectangle net NetSB6_1: 40.538,52.908 41.758,53.391
  rectangle net SCLK: 40.538,54.305 41.758,54.788
  rectangle net NetSB6_1: 38.557,53.111 41.758,54.127
  rectangle net SCLK: 37.643,54.381 41.758,55.397
  rectangle net MISO: 37.643,55.651 41.758,56.82
  rectangle net INTB#: 38.557,58.191 41.758,59.36
  rectangle net MOSI: 37.744,63.271 41.758,64.44
  rectangle net GND: -13.716,23.063 -12.37,34.366
  rectangle net GND: -11.577,24.435 -9.246,28.145
Bottom Layer:
  rectangle net GND: 45.466,32.715 47.244,33.401
  region net GND: -4.223,27.207 -5.341,27.207 -5.341,25.149 -4.223,25.149
  region net NetFB2_1: -0.432,23.393 -0.432,24.511 -2.489,24.511 -2.489,23.393
  region net 5V: -3.193,21.392 -3.193,22.327 -6.833,22.327 -6.833,21.392
  region net 3V3: 1.448,26.472 1.448,27.514 -2.482,27.514 -2.482,26.472
  rectangle net 5V: -6.624,24.046 -5.583,26.187
  rectangle net NetFB1_1: -8.026,27.534 -6.985,31.394
  rectangle net 3V3: 63.602,14.102 64.643,17.277
  region net GND: 10.465,56.998 10.465,58.268 6.172,58.268 6.172,56.998
  rectangle net NetC52_2: 23.47,22.225 24.206,22.86
  rectangle net NetC49_2: 19.339,22.083 20.127,22.87
  rectangle net NetC50_2: 20.694,22.085 21.481,22.873
  rectangle net NetC144_2: 9.957,4.826 11.176,5.74
  rectangle net NetC142_2: 9.957,6.071 11.176,6.858
  rectangle net NetC143_2: 9.957,7.391 11.176,8.179
  rectangle net NetC141_2: 9.957,8.712 11.176,9.5
  rectangle net NetC48_2: 18.041,23.07 18.778,23.756
  rectangle net NetC47_2: 16.684,23.067 17.421,23.753
  rectangle net NetC46_2: 15.327,23.05 16.064,23.736
  rectangle net NetC45_2: 14.021,23.012 14.757,23.698
  rectangle net NetC51_2: 22.062,22.098 22.849,22.885
  rectangle net GND: 8.712,0.61 11.151,1.981
  rectangle net NetC145_2: 28.118,4.216 29.235,5.029
  rectangle net NetC147_2: 28.118,5.563 29.235,6.375
  rectangle net NetC146_2: 28.118,6.833 29.235,7.645
  rectangle net NetC148_2: 28.118,8.153 29.235,8.966
  rectangle net GND: 30.455,10.16 32.436,11.328
  rectangle net NetC26_1: 19.241,-6.248 20.549,-5.207
  rectangle net GND: 11.684,2.261 14.732,3.605
  rectangle net XO_A#: 8.712,2.311 11.151,3.607
  rectangle net NetC61_2: 11.633,0.559 14.732,1.854
  rectangle net NetC26_2: 20.803,-6.248 22.885,-5.207
  rectangle net 3V3: 14.834,-5.563 15.621,-4.674
  rectangle net GND: 21.006,60.833 32.614,62.763
  rectangle net NetC1_1: 55.22,45.339 57.658,46.482
  rectangle net NetC1_2: 58.268,43.917 59.284,46.253
  rectangle net NetC23_2: 6.756,36.398 8.077,38.786
  rectangle net NetC128_2: 41.681,31.053 43.485,31.802
  rectangle net GND: 43.739,31.039 45.796,33.401
  rectangle net NetC68_1: 26.035,12.861 27.305,13.818
  rectangle net GND: -10.389,31.598 -7.036,34.392
  rectangle net OT2_2: 4.191,42.723 6.426,43.942
  rectangle net OT2_1: 4.318,36.398 6.502,37.592
  rectangle net NetC137_1: 56.744,38.76 58.09,40.234
  rectangle net NetC137_2: 58.649,37.414 59.741,39.776
  rectangle net OT1_2: 56.007,37.389 58.369,38.43
  rectangle net OT1_1: 55.194,43.917 58.064,45.161
  rectangle net NetC120_1: 42.393,32.652 43.485,33.401
  rectangle net NetR44_1: 14.097,16.307 15.215,17.348
  rectangle net 3V3: 18.604,5.105 22.389,5.969
  region net NetC55_1: 18.339,4.521 18.339,5.969 17.526,5.969 17.526,4.521
  rectangle net SDA: 49.53,34.23 51.156,35.865
  rectangle net 3V3: 59.512,43.536 60.249,44.806
  rectangle net GND: 59.766,45.771 62.84,46.482
  rectangle net GND: 19.152,3.632 21.387,4.496
  region net 3V3: 49.86,0.711 48.971,0.711 48.971,-3.429 49.86,-3.429
  rectangle net GND: 50.114,-2.489 51.003,-0.584
  rectangle net GND: 50.19,8.814 52.629,9.703
  rectangle net 3V3: 50.19,10.312 52.629,12.065
  rectangle net FB2_1: 4.318,35.027 8.128,36.043
  rectangle net FB2_2: 4.191,41.275 8.077,42.291
  rectangle net NetC138_2: 6.782,42.723 7.849,45.187
  rectangle net 3V3: 30.429,11.633 32.436,12.548
  rectangle net 3V3: 21.514,11.633 23.52,12.548
  rectangle net GND: 21.514,10.135 23.52,11.328
  rectangle net GND: 12.7,9.83 14.707,11.328
  rectangle net 3V3: 12.344,11.633 14.707,14.427
  rectangle net NetC69_2: 33.477,11.174 34.252,13.867
  rectangle net NetC136_2: 34.442,11.174 35.103,12.495
  rectangle net NetC68_2: 24.536,11.176 25.311,13.868
  rectangle net NetC135_2: 25.502,11.176 26.162,12.497
  rectangle net NetC60_2: 15.596,11.176 16.37,13.868
  rectangle net NetC98_2: 16.561,11.176 17.221,12.497
  rectangle net GND: 3.556,10.16 5.613,11.354
  rectangle net 3V3: -3.124,11.608 5.613,12.573
  rectangle net NetC99_2: 7.62,11.176 8.28,12.497
  rectangle net NetC63_2: 6.655,11.176 7.429,13.868
  rectangle net NetC63_1: 8.128,12.852 9.55,13.767
  rectangle net NetC60_1: 17.094,12.852 18.364,13.843
  rectangle net NetC69_1: 34.823,12.852 36.246,13.843
  rectangle net 3V3: 14.935,-5.512 15.621,-1.245
  rectangle net GND: 46.761,2.235 49.378,3.429
  rectangle net NetC70_2: 46.761,3.759 49.378,4.953
  rectangle net XI_B: 44.323,3.734 46.279,4.953
  rectangle net GND: 16.053,0.838 20.472,1.994
  rectangle net NetC53_2: 18.669,2.591 20.472,3.404
  rectangle net NetC53_2: 17.805,2.261 20.472,2.934
  rectangle net OT3_1: 20.625,-8.687 22.885,-6.502
  rectangle net OT3_2: 27.026,-8.865 28.219,-6.553
  rectangle net OT4_2: 34.112,-8.865 35.306,-6.553
  rectangle net OT4_1: 40.335,-8.928 41.605,-6.528
  rectangle net GND: 42.342,34.722 47.803,36.068
  rectangle net GND: 46.203,35.357 47.803,37.592
  rectangle net NetC126_1: 43.993,36.347 45.771,37.617
  rectangle net FB1_2: 56.109,35.763 59.639,36.855
  rectangle net 3V3: 43.591,33.655 48.278,34.464
  rectangle net NetC123_1: 41.173,33.579 43.282,34.493
  rectangle net 3V3: 48.082,33.045 49.073,35.306
  rectangle net 3V3: 5.156,62.23 5.791,62.814
  rectangle net "DEBUG SIG.ENABLE": 6.121,62.052 7.239,64.211
  rectangle net FB1_1: 55.804,42.291 59.307,43.383
  rectangle net 3V3: -3.378,41.199 1.473,42.088
  rectangle net GND: -10.363,31.598 0.559,40.97
  rectangle net GND: 50.216,61.163 51.46,61.976
  rectangle net GND: 46.634,61.214 51.46,62.636
  rectangle net 3V3: 59.512,44.729 62.586,45.542
  region net 3V3: 10.465,58.471 10.465,59.487 7.696,59.487 7.696,58.471
  rectangle net GND: -3.124,10.058 5.613,10.998
  rectangle net 3V3: -3.124,11.176 3.251,12.192
  rectangle net 3V3: 20.422,63.094 31.648,64.567
  rectangle net NetJ2_A5: -12.294,28.219 -10.846,29.286
  rectangle net NetJ2_B5: -12.294,29.464 -10.846,30.531

## Silkscreen, mask and mechanical layers (free items; w line width, h text height)
Top Overlay:
  lines w0.254: 7.264,22.225 7.264,23.495 ; 9.068,22.327 9.068,23.47 ; 12.065,32.08 12.065,33.02 ; 13.233,17.958 13.233,18.263 13.386,18.415 14.122,18.415 ; 21.844,17.958 21.844,18.263 21.996,18.415 22.733,18.415 ; 25.222,22.2 25.222,23.216 25.527,23.52 ; 26.645,33.604 26.645,34.036 ; 27.356,23.292 27.356,23.546 ; 29.489,23.495 30.023,22.962 31.344,22.962 32.055,23.673 ; 31.267,24.917 31.572,25.222 32.207,25.222 ; 37.592,-11.227 37.668,-11.151 38.329,-11.151 38.659,-10.82 38.659,-8.89 ; 38.71,11.989 38.71,11.303 39.357,10.655 ; 41.351,32.258 41.758,32.258 45.009,29.007 ; 41.377,30.861 42.088,30.861 43.891,29.058 ; 41.402,29.591 42.393,29.591 42.799,29.185 42.799,29.108 ; 42.57,-8.966 42.57,-9.322 42.697,-9.449 44.907,-9.449 45.212,-9.754 ; 47.422,29.083 50.394,32.055 50.902,32.055 ; 48.539,29.083 50.165,30.709 50.927,30.709 ; 49.86,29.134 50.216,29.489 51.156,29.489 ; 58.115,32.385 58.115,34.392 ; 59.665,10.744 60.858,10.744 61.468,11.354 61.468,11.989
  text "RX" at 68.013,40.623 h1.02
  text "TX" at 68.013,38.083 h1.02
  text "RTS" at 67.566,35.543 h1.02
  text "NetP6_1" at 59.934,33.148 h1.02
  text "DTR" at 67.456,33.003 h1.02
  text "NetP5_1" at 59.934,30.97 h1.02
  text "GND" at 67.286,30.463 h1.02
  text "NetP3_1" at 59.934,28.791 h1.02
  text "EN" at 67.437,27.737 h1.02
  text "NetP4_1" at 59.934,26.613 h1.02
  text "IO_0" at 67.389,25.052 h1.02
  text "NetP2_1" at 59.934,24.435 h1.02
  text "USB" at -7.036,24.054 h1.02 r90
  text "RX" at 68.021,22.657 h1.02
  text "TX" at 68.021,20.041 h1.02
  text "GND" at 67.31,17.424 h1.02
  text "3V3" at 67.31,14.884 h1.02
Bottom Overlay:
  drawing of 3089 lines, arcs and shapes, not listed
  text "ZERO CARBON FOOTPRINT" at 40.488,43.383 h1.02
  text "RX" at 70.223,40.648 h1.02
  text "TX" at 70.223,38.108 h1.02
  text "RTS" at 70.223,35.568 h1.02
  text "DTR" at 70.223,33.028 h1.02
  text "GND" at 70.223,30.488 h1.02
  text "EN" at 70.307,27.737 h1.02
  text "IO_0" at 70.096,25.078 h1.02
  text "RX" at 70.282,22.657 h1.02
  text "TX" at 70.155,20.066 h1.02
  text "GND" at 70.206,17.399 h1.02
  text "3V3" at 70.206,14.859 h1.02
Board Outline:
  lines w0.254: 16.484,71.381 ccw(c30.523,28.627) 44.649,71.353 ; 16.488,71.381 16.488,66.116 39.878,66.116 ; 39.649,66.116 44.649,66.116 44.649,71.356
Fabrication.:
  drawing of 443 lines, arcs and shapes, not listed
  text "Layer" at 97.129,94.009 h1.52
  text "Name" at 107.541,94.009 h1.52
  text "Material" at 131.156,94.009 h1.52
  text "Thickness" at 152.994,94.009 h1.52
  text "Constant" at 169.5,94.009 h1.52
  text "Board Layer Stack" at 183.975,94.009 h1.52
  text "Top Overlay" at 107.541,90.961 h1.52
  text "Top Solder" at 107.541,87.913 h1.52
  text "Solder Resist" at 131.156,87.913 h1.52
  text "3.00mil" at 152.994,87.913 h1.52
  text "3.5" at 169.5,87.913 h1.52
  text "1" at 97.129,84.865 h1.52
  text "Top Layer" at 107.541,84.865 h1.52
  text "10.00mil" at 152.994,84.865 h1.52
  text "Dielectric 1" at 107.541,81.817 h1.52
  text "FR-4" at 131.156,81.817 h1.52
  text "37.00mil" at 152.994,81.817 h1.52
  text "4.8" at 169.5,81.817 h1.52
  text "2" at 97.129,78.769 h1.52
  text "Bottom Layer" at 107.541,78.769 h1.52
  text "10.00mil" at 152.994,78.769 h1.52
  text "Bottom Solder" at 107.541,75.721 h1.52
  text "Solder Resist" at 131.156,75.721 h1.52
  text "3.00mil" at 152.994,75.721 h1.52
  text "3.5" at 169.5,75.721 h1.52
  text "Bottom Overlay" at 107.541,72.673 h1.52